# Altium PCB uECG.PcbDoc (part 1 of 2)
Units mm, origin at the board's own origin, x right, y up, seen from the top; angles counter-clockwise.
Board outline 18.82 x 18.5 mm, 4 copper layers (Top Layer, Layer 1, Layer 2, Bottom Layer), stack 1.564 mm thick; 53 components, 42 nets, 232 pads, 40 vias.
Unrouted connection lines stored in the file: 26.
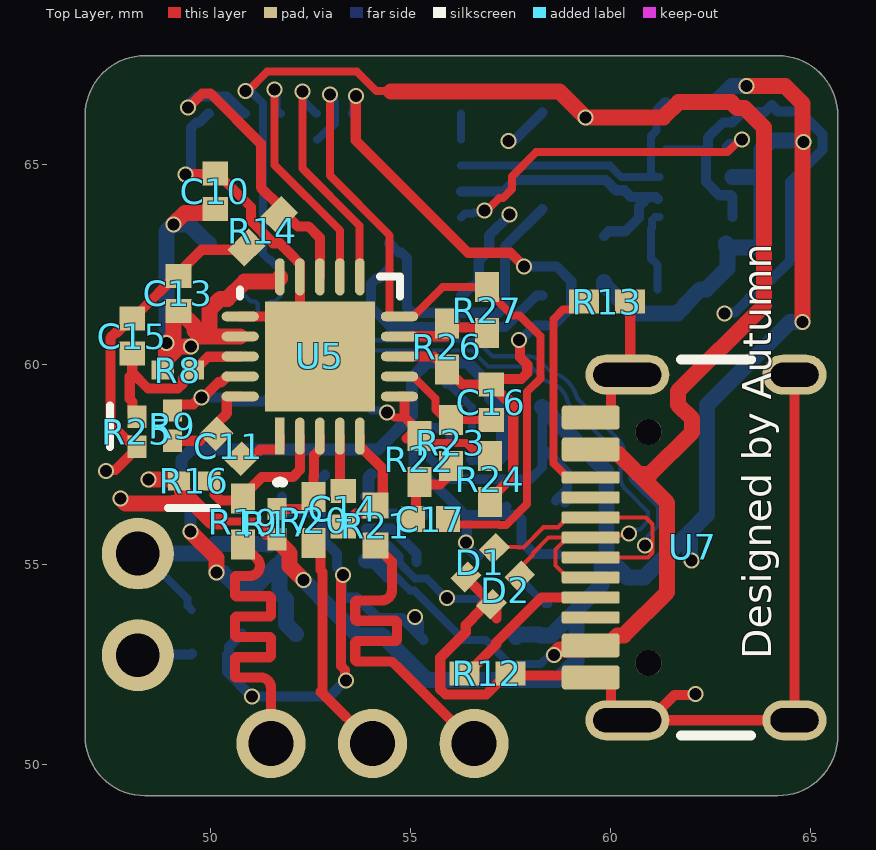
[diagram p0: Top Layer view]
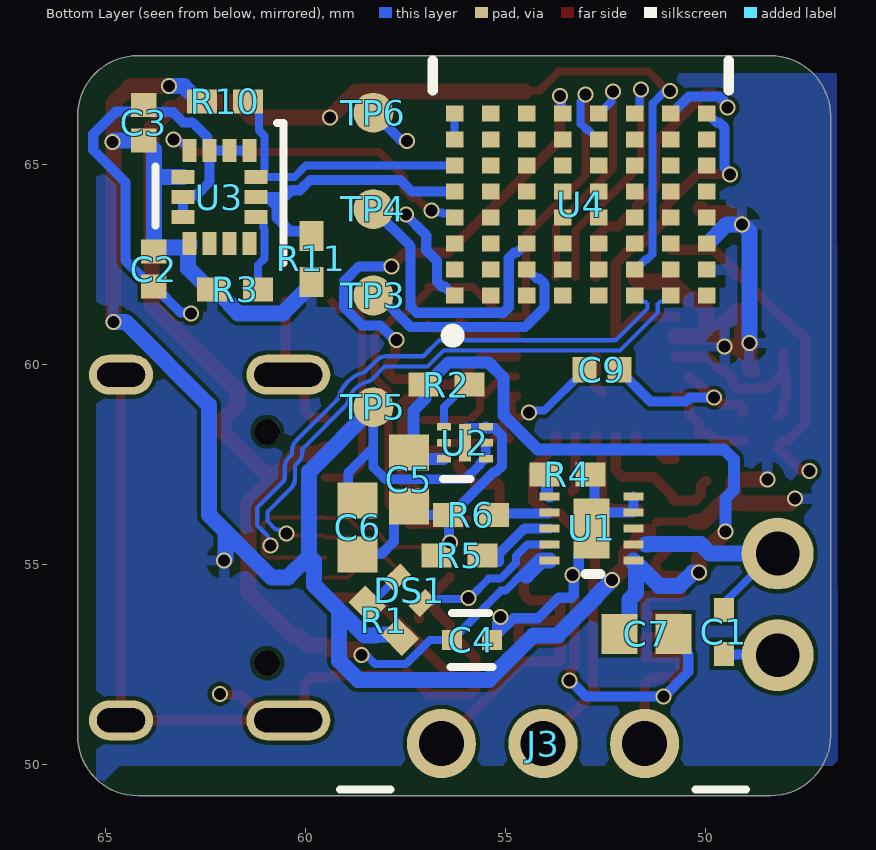
[diagram p1: Bottom Layer view, seen from below]
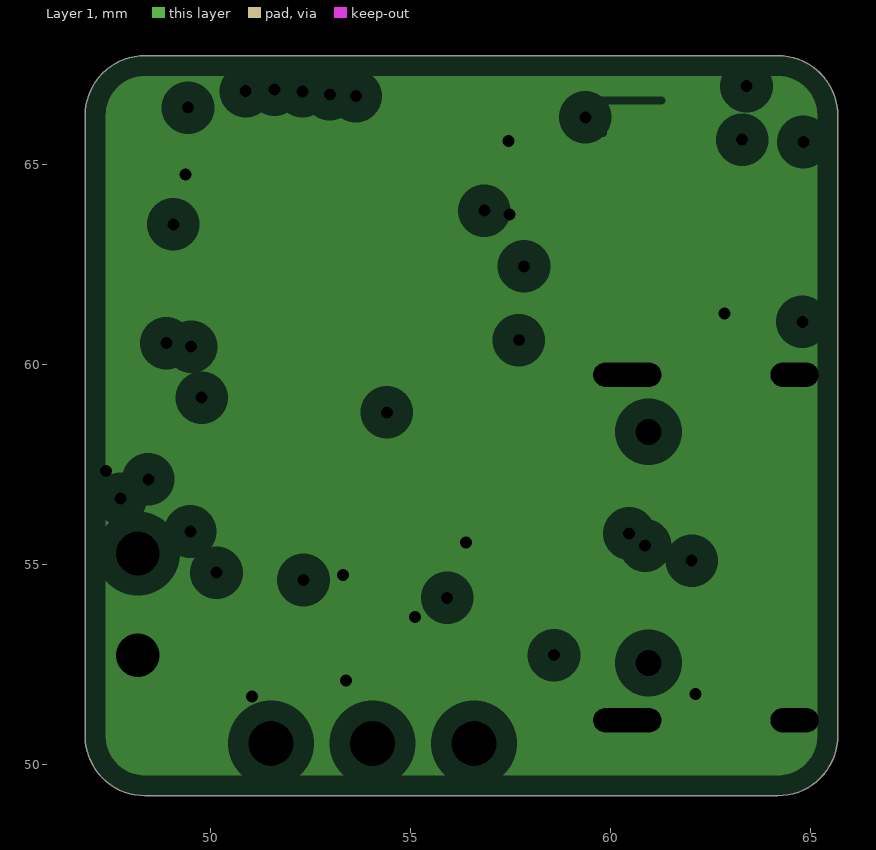
[diagram p2: Layer 1, clearances drawn from the general rule]
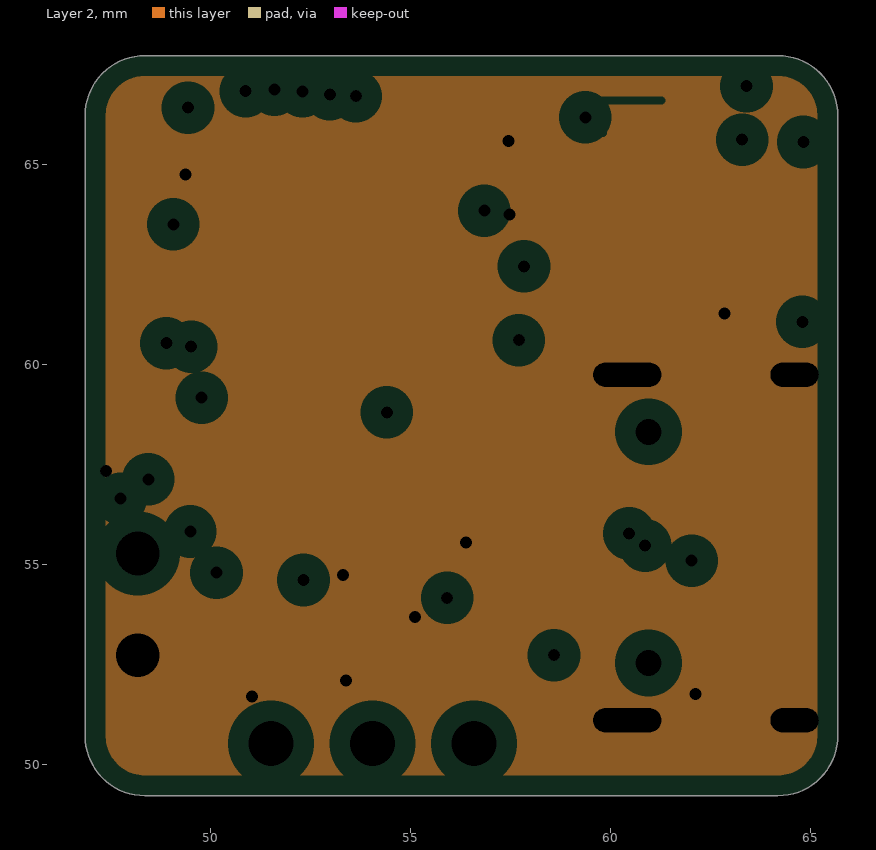
[diagram p3: Layer 2, clearances drawn from the general rule]

## Layer stack, top to bottom
Top Solder: solder mask 0.0102, Solder Resist, Dk 3.5
Top Layer: signal copper 0.035
Dielectric 2: prepreg 0.0994, PP-006, Dk 4.1
Layer 1: plane copper 0.0152, net GND
Dielectric 1: dielectric 1.265, FR-4, Dk 4.1
Layer 2: plane copper 0.0152, net GND
Dielectric 3: prepreg 0.0994, PP-006, Dk 4.1
Bottom Layer: signal copper 0.035
Bottom Solder: solder mask 0.0102, Solder Resist, Dk 3.5

## Board outline
48.363,49.217 cw(c48.363,50.717) 46.863,50.717 46.863,66.216 cw(c48.363,66.216) 48.363,67.716 64.184,67.716 cw(c64.184,66.216) 65.684,66.216 65.684,50.717 cw(c64.184,50.717) 64.184,49.217

## Design rules (kind name [scope] priority, off if disabled: settings)
Clearance [All] p1: gap=0.1 ignorepadtopadclearanceinfootprint=TRUE except(0.15: SMDPad-SMDPad; 0.2: Arc-Hole Track-Hole)
ComponentClearance ComponentClearance_1 [InComponent('B1')] p1: gap=0 collisioncheckmode=3 verticalgap=2540 showdistances=TRUE
ComponentClearance [All] p2: gap=0.1 collisioncheckmode=3 verticalgap=2540 showdistances=TRUE
DiffPairsRouting [All] p1: maxlimit=0.15 minlimit=0.15 mostfreqgap=0.15 toplayer_minwidth=0.104 toplayer_maxwidth=0.104 toplayer_prefwidth=0.104 bottomlayer_minwidth=0.104 bottomlayer_maxwidth=0.104 bottomlayer_prefwidth=0.104 impedanceprofiledriven=TRUE impedanceprofileid={66AD4E38-8EE7-434F-8265-27BB537C61B1} impedanceprofilevalue=100.000000 maxuncoupledlength=12.7
MatchedLengths [All] p1: tolerance=25.4 checknetsindiffpair=FALSE checkdiffpairvsdiffpair=TRUE checkxsignals=TRUE checkothers=TRUE
PlaneClearance [All] p1: clearance=0.508
PlaneConnect [All] p1: planeconnectstyle=Relief reliefexpansion=0.508 reliefentries=2 reliefconductorwidth=0.254 reliefairgap=0.254
PolygonConnect [All] p1: connectstyle=Relief reliefconductorwidth=0.254 reliefentries=4 polygonreliefangle="90 Angle" airgapwidth=0.254
RoutingVias [All] p1: holewidth=0.3 width=0.4 viastyle="Through Hole" minholewidth=0.3 minwidth=0.4 maxholewidth=0.3 maxwidth=0.4
SolderMaskExpansion [All] p1: expansion=0 istentingtop=FALSE
SupplyNets "Schematic Supply Nets" [InNet('GND')] p1: voltage=0.000
Width VBUS [InNet('VBUS') OR InNet('VOUT') OR InNet('BAT') or InNet('3V3')] p1: maxlimit=0.4 minlimit=0.2 preferedwidth=0.4 minimp=50.000000 maximp=50.000000 favimp=50.000000
Width [All] p2: maxlimit=0.3 minlimit=0.102 preferedwidth=0.2 minimp=50.000000 maximp=50.000000 favimp=50.000000
26 further rules are at their usual default settings.

## Classes and differential pairs
differential pair D: +D_P -D_N

## Components (designator, comment, footprint, x,y, rotation, side; value= is the part's Value field where it differs from the comment)
C1 "0402YD105MAT2A" FP-0402-L_1_0_1-W_0_5_0_1-MFG 49.53,53.315 r270 bottom
C2 "0.1 µF" "CAP 0402_1005" 63.779,62.382 r90 bottom
C3 "0.1 µF" "CAP 0402_1005" 64.033,66.04 r270 bottom
C4 "CC0402KRX5R8BB105" FP-CC0402-MFG 55.829,53.111 r180 bottom value="1 uF"
C5 "2.2 µF" "CAP 0603_1608" 57.404,57.125 r90 bottom
C6 "2.2 µF" "CAP 0603_1608" 58.685,55.927 r90 bottom
C7 "10 µF" "CAP 0603_1608" 51.46,53.264 r0 bottom
C9 "4.7 µF" "CAP 0402_1005" 52.578,59.868 r0 bottom
C10 "4.7 µF" "CAP 0402_1005" 50.114,64.33 r90 top
C11 "4.7 µF" "CAP 0402_1005" 50.456,57.953 r135 top
C13 "0.1 µF" "CAP 0402_1005" 49.2,61.773 r270 top
C14 "1000 pF" "CAP 0402_1005" 53.315,56.388 r90 top
C15 "0.1 µF" "CAP 0402_1005" 48.043,60.707 r270 top
C16 "6800 pF" "CAP 0402_1005" 57.023,59.055 r270 top
C17 "2700 pF" "CAP 0402_1005" 55.499,56.134 r180 top
D1 "ESD321DPYR" FP-DPY0002A-MFG 56.744,55.042 r225 top value=0.9pF
D2 "ESD321DPYR" FP-DPY0002A-MFG 57.379,54.356 r225 top value=0.9pF
DS1 "16-219A/T2D-AR2T1QY/3T" EVRL-0402-2_V 57.379,54.356 r225 bottom
J3 "0705530002" "MOLEX SDA-70553-3PIN" 54.051,44.298 r0 bottom
R1 "1 kOhms" "RES 0402_1005" 58.039,53.596 r45 bottom
R2 "10 kOhms" "RES 0402_1005" 56.467,59.495 r0 bottom
R3 "10K" "RES 0402_1005" 61.747,61.874 r180 bottom
R4 "10 kOhms" "RES 0402_1005" 53.441,57.241 r0 bottom
R5 "3 kOhms" "RES 0402_1005" 56.134,55.22 r180 bottom
R6 "18 kOhms" "RES 0402_1005" 55.855,56.236 r180 bottom
R8 "CRGCQ0402J10M" FP-CRGCQ0402-IPC_C 49.186,59.858 r0 top value=10MΩ
R9 "CRGCQ0402J10M" FP-CRGCQ0402-IPC_C 49.047,58.471 r270 top value=10MΩ
R10 "10 kOhms" "RES 0402_1005" 62.001,66.573 r0 bottom
R11 "10 kOhms" "RES 0402_1005" 59.842,62.636 r270 bottom
R12 "5.1K" "RES 0402_1005" 56.921,52.273 r180 top
R13 "5.1K" "RES 0402_1005" 59.919,61.57 r180 top
R14 "100 kOhms" "RES 0402_1005" 51.309,63.325 r45 top
R16 "10M" FP-CRGCQ0402-IPC_C 49.59,57.087 r0 top value=10MΩ
R17 "10M" FP-CRGCQ0402-IPC_C 51.664,56.007 r90 top value=10MΩ
R19 "330 kOhms" "RES 0402_1005" 50.815,56.066 r90 top
R20 "330 kOhms" "RES 0402_1005" 52.578,56.106 r90 top
R21 "CRCW0402360KJNED" RESC1005X40X25ML05T05 54.131,55.968 r270 top
R22 "1 MOhms" "RES 0402_1005" 55.22,57.633 r90 top
R23 "1 MOhms" "RES 0402_1005" 56.007,58.039 r90 top
R24 "100 kOhms" "RES 0402_1005" 56.99,57.13 r90 top
R25 "CRGCQ0402J10M" FP-CRGCQ0402-IPC_C 48.158,58.318 r90 top value=10MΩ
R26 "332 kOhms" "RES 0402_1005" 55.917,60.441 r270 top
R27 "1 MOhms" "RES 0402_1005" 56.914,61.354 r270 top
TP3 "TestPoint_Small" TestPoint_Pad_D1.0mm 58.293,61.722 r180 bottom
TP4 "TestPoint_Small" TestPoint_Pad_D1.0mm 58.293,63.881 r180 bottom
TP5 "TestPoint_Small" TestPoint_Pad_D1.0mm 58.293,58.928 r180 bottom
TP6 "TestPoint_Small" TestPoint_Pad_D1.0mm 58.293,66.294 r180 bottom
U1 "BQ25185DLHR" WSON-10_L2.2-W2.0-P0.40-BL-EP_TI_DLH0010A 52.443,55.74 r90 bottom
U2 "MIC5528-3.3YMT-TR" FP-TDFN1212-6LD-PL-1-MFG 56.007,58.039 r0 bottom
U3 "LSM6DSRTR" FP-LGA-14L-DM00249496-MFG 62.14,64.18 r270 bottom
U4 "HJ-840" LGA-64_L7.0-W6.2-P0.90-R8-C8-S0.65-BL 53.122,64.204 r180 bottom locked
U5 "AD8232ACPZ-WP" FP-CP-20-8-IPC_A 52.734,60.197 r90 top locked
U7 "USB_C_Receptacle_USB2.0_14P" USB_C_Receptacle_HRO_TYPE-C-31-M-12 63.551,55.423 r90 top

## Footprints (in the part's own frame and the unit in brackets; to place one, negate y for a bottom-side part, rotate by r counter-clockwise, add the part's x,y. Pads: shape width x height; smd on the part's side, far side on the other; paste and mask are expansions set on the pad)
"CAP 0402_1005" [mm] "Chip Capacitor, 2-Leads, Body 1.02x0.51mm, IPC Medium Density"
  rect 0.6x0.64 smd: 1(-0.44,0) 2(0.44,0)
  body extent -0.5,-0.26 0.5,0.26, height 0.52
"CAP 0603_1608" [mm] "Chip Capacitor, 2-Leads, Body 1.60x0.80mm, IPC Medium Density"
  rect 0.9x1 smd: 1(-0.675,0) 2(0.675,0)
  body extent -0.8,-0.41 0.8,0.41, height 0.82
EVRL-0402-2_V [mm] "SMD, 2-Leads, Body 1x0.5mm"
  rect 0.4x0.6 smd: 1(-0.45,0) 2(0.45,0)
  body extent -0.5,-0.25 0.5,0.25, height 0.25
FP-0402-L_1_0_1-W_0_5_0_1-MFG [mm]
  rect 0.6x0.5 smd paste+0 mask+0: 1(-0.55,0) 2(0.55,0)
  body extent -0.5,-0.25 0.5,0.25, height 0.56
FP-CC0402-MFG [mm]
  rect 0.5x0.5 smd paste+0 mask+0: 1(-0.5,0) 2(0.5,0)
  silkscreen extent -0.53,-0.68 0.52,0.67, body extent -0.5,-0.25 0.5,0.25, height 0.55
FP-CP-20-8-IPC_A [mm]
  rect 0.931x0.239 smd paste+0 mask+0: 1(-1.991,1)
  rrect100% 0.931x0.239 smd paste+0 mask+0: 2(-1.991,0.5) 3(-1.991,0) 4(-1.991,-0.5) 5(-1.991,-1) 11(1.991,-1) 12(1.991,-0.5) 13(1.991,0) 14(1.991,0.5) 15(1.991,1)
  rrect100% 0.239x0.931 smd paste+0 mask+0: 6(-1,-1.991) 7(-0.5,-1.991) 8(0,-1.991) 9(0.5,-1.991) 10(1,-1.991) 16(1,1.991) 17(0.5,1.991) 18(0,1.991) 19(-0.5,1.991) 20(-1,1.991)
  rect 2.75x2.75 smd paste-1000 mask+0: 21(0,0)
  silkscreen extent -3.16,-2 2,2, body extent -2.96,-2.96 2.96,2.96, height 0.25
FP-CRGCQ0402-IPC_C [mm]
  rect 0.56x0.472 smd paste+0 mask+0: 1(-0.376,0) 2(0.376,0)
  body extent -0.76,-0.38 0.76,0.38, height 0.25
FP-DPY0002A-MFG [mm]
  rect 0.6x0.5 smd paste+0 mask+0: 1(-0.5,0) 2(0.5,0)
  body extent -0.5,-0.3 0.5,0.3, height 0.45
FP-LGA-14L-DM00249496-MFG [mm]
  rect 0.575x0.35 smd paste-1000 mask+0: 1(-1.162,0.75) 2(-1.162,0.25) 3(-1.162,-0.25) 4(-1.162,-0.75) 8(1.162,-0.75) 9(1.162,-0.25) 10(1.162,0.25) 11(1.163,0.75)
  rect 0.35x0.575 smd paste-1000 mask+0: 5(-0.5,-0.913) 6(0,-0.913) 7(0.5,-0.913) 12(0.5,0.913) 13(0,0.913) 14(-0.5,0.913)
  silkscreen extent -1.85,-1.6 1.65,1.6, body extent -1.5,-1.25 1.5,1.25, height 0.86
FP-TDFN1212-6LD-PL-1-MFG [mm]
  rect 0.35x0.18 smd paste+0 mask+0: 1(-0.525,0.4) 2(-0.525,0) 3(-0.525,-0.4) 4(0.525,-0.4) 5(0.525,0) 6(0.525,0.4)
  rect 0.3x0.94 smd paste+0 mask+0: 7(0,0)
  silkscreen extent -0.15,0.9 0.54,0.9, body extent -0.6,-0.6 0.6,0.6, height 0.6
LGA-64_L7.0-W6.2-P0.90-R8-C8-S0.65-BL [mm] "LGA-64_L7.0-W6.2-P0.90-R8-C8-S0.65-BL"
  rect 0.44x0.4 smd: A1(-3.137,-2.486) A2(-3.137,-1.836) A3(-3.137,-1.186) A4(-3.137,-0.536) A5(-3.137,0.114) A6(-3.137,0.764) A7(-3.137,1.414) A8(-3.137,2.064) B1(-2.237,-2.486) B2(-2.237,-1.836) B3(-2.237,-1.186) B4(-2.237,-0.536) B5(-2.237,0.114) B6(-2.237,0.764) B7(-2.237,1.414) B8(-2.237,2.064) C1(-1.337,-2.486) C2(-1.337,-1.836) C3(-1.337,-1.186) C4(-1.337,-0.536) C5(-1.337,0.114) C6(-1.337,0.764) C7(-1.337,1.414) C8(-1.337,2.064) D1(-0.437,-2.486) D2(-0.437,-1.836) D3(-0.437,-1.186) D4(-0.437,-0.536) D5(-0.437,0.114) D6(-0.437,0.764) D7(-0.437,1.414) D8(-0.437,2.064) E1(0.463,-2.486) E2(0.463,-1.836) E3(0.463,-1.186) E4(0.463,-0.536) E5(0.463,0.114) E6(0.463,0.764) E7(0.463,1.414) E8(0.463,2.064) F1(1.363,-2.486) F2(1.363,-1.836) F3(1.363,-1.186) F4(1.363,-0.536) F5(1.363,0.114) F6(1.363,0.764) F7(1.363,1.414) F8(1.363,2.064) G1(2.263,-2.486) G2(2.263,-1.836) G3(2.263,-1.186) G4(2.263,-0.536) G5(2.263,0.114) G6(2.263,0.764) G7(2.263,1.414) G8(2.263,2.064) H1(3.163,-2.486) H2(3.163,-1.836) H3(3.163,-1.186) H4(3.163,-0.536) H5(3.163,0.114) H6(3.163,0.764) H7(3.163,1.414) H8(3.163,2.064)
  silkscreen extent -3.69,-3.64 3.71,3.39, body extent -3.49,-2.29 3.51,3.91, height 0.92
"MOLEX SDA-70553-3PIN" [mm] "SL Right Angle Header W/LAtch & Trip-Pegs 2.54mm Centres"
  round 1.73 hole 1.13: 1(-2.54,-6.223) 2(0,-6.223) 3(2.54,-6.223)
  silkscreen extent -5.08,-5.08 5.08,-5.08
"RES 0402_1005" [mm] "Chip Resistor, 2-Leads, Body 1.0x0.5mm, IPC Medium Density"
  rect 0.75x0.6 smd: 1(-0.575,0) 2(0.575,0)
  body extent -0.5,-0.25 0.5,0.25, height 0.35
RESC1005X40X25ML05T05 [mm] "Chip Resistor, 2-Leads, Body 1.00x0.50mm, IPC Low Density"
  rect 0.65x0.65 smd: 1(-0.5,0) 2(0.5,0)
  body extent -0.53,-0.27 0.53,0.28, height 0.4
TestPoint_Pad_D1.0mm [mm]
  round 1 smd: 1(0,0)
USB_C_Receptacle_HRO_TYPE-C-31-M-12 [mm]
  rrect25% 0.6x1.45 smd: A1(-3.25,4.045) A4(-2.45,4.045) A9(2.45,4.045) A12(3.25,4.045) B1(3.25,4.045) B4(2.45,4.045) B9(-2.45,4.045) B12(-3.25,4.045)
  rrect25% 0.3x1.45 smd: A5(-1.25,4.045) A6(-0.25,4.045) A7(0.25,4.045) A8(1.25,4.045) B5(1.75,4.045) B6(0.75,4.045) B7(-0.75,4.045) B8(-1.75,4.045)
  rrect100% 1x1.6 hole 1.2 slot 0.6 at 0 deg: SH(-4.32,-1.05) SH(4.32,-1.05)
  rrect100% 1x2.1 hole 1.7 slot 0.6 at 0 deg: SH(-4.32,3.13) SH(4.32,3.13)
  round 0.65 hole 0.65: Un1(-2.89,2.6) Un2(2.89,2.6)
  silkscreen extent -4.7,0.04 4.7,1.79
WSON-10_L2.2-W2.0-P0.40-BL-EP_TI_DLH0010A [mm] "WSON-10_L2.2-W2.0-P0.40-BL-EP_TI_DLH0010A"
  rect 0.2x0.5 smd: 1(-0.642,-0.657) 2(-0.242,-0.657) 3(0.158,-0.657) 4(0.558,-0.657) 5(0.958,-0.657) 6(0.958,1.443) 7(0.558,1.443) 8(0.158,1.443) 9(-0.242,1.443) 10(-0.642,1.443)
  rect 1.5x0.9 smd: 11(0.158,0.393)
  silkscreen extent -0.99,0.17 -0.99,0.55, body extent -0.84,-0.72 1.17,1.5, height 0.8

## Part data
C1: library part CMP-04427-002736-1, "General Purpose Ceramic Capacitor, 0402, 1uF, 20%, X5R, 15%, 16V", Capacitance=1uF, Case/Package=0402, Dielectric=X5R, Max Operating Temperature=85°C, Min Operating Temperature=-55°C, Package Quantity=10000, Tolerance=20%, Voltage Rating (DC)=16V, packaging="Tape and Reel", RoHS Compliant=Yes
C2 C3 C13 C15: library part CL05B104KP5VPNC, "CAP CER 100NF 10V X7R 0402", Device Package="0402 (1005 Metric)", manufacturer="Samsung Electro-Mechanics", Operating Temperature="-55°C ~ 125°C", Ratings=AEC-Q200, Supplier Part Number 1=1276-CL05B104KP5VPNCCT-ND, Temperature Coefficient=X7R, Tolerance=±10%, Voltage - Rated=10V, Applications=Automotive, Capacitance="0.1 µF", componentlink1description=Datasheet, componentlink1url=https://mm.digikey.com/Volume0/opasdata/d220001/medias/docus/5458/CL05B104KP5VPNC_Spec.pdf, componentlink2description="DigiKey Link", componentlink2url=https://www.digikey.com/en/products/detail/samsung-electro-mechanics/CL05B104KP5VPNC/20498482, Features="General Purpose", lastupdated="06-04-2026 19:07:45", Lifecycle Status=Active, Minimum Order=1, Mounting Type="Surface Mount, MLCC, Epoxy", Package / Case="0402 (1005 Metric)", packaging=TapeAndReel, Part Number=CL05B104KP5VPNC, partid=56690, price=0.01, series=CL, Size / Dimension="0.039\" L x 0.020\" W (1.00mm x 0.50mm)", Supplier 1=DigiKey, Thickness (Max)="0.022\" (0.55mm)"
C4: library part CMP-03422-000114-1, "CAP CER 1UF 25V X5R 0402", Capacitance="1 uF", manufacturer=YAGEO, Package=CC0402, Temperature="-55°C to +125°C", Temperature Characteristic=X5R, Temperature Coefficient=30ppm/°C, Temperature Range High=+125°C, Temperature Range Low=-55°C, Tolerance=0.1, Voltage Rating="25 V", Automotive=No, Automotive Grade=NA, Category=Cap, componentlink2description=Datasheet, componentlink2url=http://www.yageo.com/documents/recent/UPY-GP_NP0_16V-to-50V_16.pdf, Device Class L1="Passive Components", Device Class L2=Capacitors, Device Class L3="Ceramic Capacitors", Digikey Description="CAP CER 1UF 25V X5R 0402", Footprint Url=http://www.yageo.com/exep/pages/download/literatures/UPY-C_GEN_24.pdf, Height=0.55mm, Ipc Land Pattern Name=CAPC10050X50, Lead Free=Yes, Manufacturer Part Number=CC0402KRX5R8BB105, Material=Ceramic, Mouser Description="Multilayer Ceramic Capacitors MLCC - SMD/SMT 1M pF 10% 25 Volts", Octopart=https://octopart.com/cc0402krx5r8bb105-yageo-57080749, RoHS=TRUE
C5 C6: library part GRM188R61E225KA12D, "CAP CER 2.2UF 16V X5R 0402", Device Package="0402 (1005 Metric)", manufacturer="Samsung Electro-Mechanics", Operating Temperature="-55°C ~ 85°C", Part Number=CL05A225KO5NQNC, Supplier Part Number 1=1276-1461-1-ND, Temperature Coefficient=X5R, Tolerance=±10%, Voltage - Rated=16V, Applications="General Purpose", Capacitance="2.2 µF", componentlink1description=Datasheet, componentlink1url=http://www.samsungsem.com/kr/support/product-search/mlcc/CL05A225KO5NQNC.jsp, componentlink2description="DigiKey Link", componentlink2url=https://www.digikey.com/en/products/detail/samsung-electro-mechanics/CL05A225KO5NQNC/3887119, id=34, lastupdated=2023-01-03T20:04:20.330, Lifecycle Status=Active, Minimum Order=1, Mounting Type="Surface Mount, MLCC", Package / Case="0402 (1005 Metric)", packaging=TapeAndReel, Part Status=Active, partid=1761, price=0.03, series=CL, Size / Dimension="0.039\" L x 0.020\" W (1.00mm x 0.50mm)", Supplier 1=DigiKey, Thickness (Max)="0.022\" (0.55mm)"
C7: library part TMK107BBJ106MA-T, "CAP CER 10UF 25V X5R 0603", Device Package="0603 (1608 Metric)", manufacturer="Taiyo Yuden", Operating Temperature="-55°C ~ 85°C", Supplier Part Number 1=587-6023-1-ND, Temperature Coefficient=X5R, Tolerance=±20%, Voltage - Rated=25V, Applications="SMPS Filtering", Capacitance="10 µF", componentlink1description=Datasheet, componentlink1url="https://ds.yuden.co.jp/TYCOMPAS/ut/detail?pn=TMK107BBJ106MA-T &u=M", componentlink2description="DigiKey Link", componentlink2url=https://www.digikey.com/en/products/detail/taiyo-yuden/TMK107BBJ106MA-T/7403921, id=1600, lastupdated=2023-01-03T20:07:28.623, Lifecycle Status=Active, Minimum Order=1, Mounting Type="Surface Mount, MLCC", Package / Case="0603 (1608 Metric)", packaging=TapeAndReel, Part Number=TMK107BBJ106MA-T, Part Status=Active, partid=8967, price=0.07, series=M, Size / Dimension="0.063\" L x 0.031\" W (1.60mm x 0.80mm)", Supplier 1=DigiKey, Thickness (Max)="0.039\" (1.00mm)"
C9 C10 C11: library part CL05A475MO5NUNC, "CAP CER 4.7UF 16V X5R 0402", Device Package="0402 (1005 Metric)", manufacturer="Samsung Electro-Mechanics", Operating Temperature="-55°C ~ 85°C", Supplier Part Number 1=1276-6836-1-ND, Temperature Coefficient=X5R, Tolerance=±20%, Voltage - Rated=16V, Applications="General Purpose", Capacitance="4.7 µF", componentlink1description=Datasheet, componentlink1url=http://www.samsungsem.com/kr/support/product-search/mlcc/__icsFiles/afieldfile/2019/05/29/Data%20sheet_CL05A475MO5NUNC.pdf, componentlink2description="DigiKey Link", componentlink2url=https://www.digikey.com/en/products/detail/samsung-electro-mechanics/CL05A475MO5NUNC/5961320, lastupdated="06-04-2026 19:11:12", Lifecycle Status=Active, Minimum Order=1, Mounting Type="Surface Mount, MLCC", Package / Case="0402 (1005 Metric)", packaging=TapeAndReel, Part Number=CL05A475MO5NUNC, Part Status=Active, partid=1760, price=0.07, series=CL, Size / Dimension="0.039\" L x 0.020\" W (1.00mm x 0.50mm)", Supplier 1=DigiKey, Thickness (Max)="0.028\" (0.70mm)"
C14: library part C0402C102K1GECAUTO, "CAP CER 0402 1NF 100V C0G 10%", Device Package="0402 (1005 Metric)", manufacturer=KEMET, Operating Temperature="-55°C ~ 125°C", Ratings=AEC-Q200, Supplier Part Number 1=399-17168-1-ND, Temperature Coefficient="C0G, NP0", Tolerance=±10%, Voltage - Rated=100V, Applications="Automotive, ESD Protection", Capacitance="1000 pF", componentlink1description=Datasheet, componentlink1url=https://api.kemet.com/component-edge/download/datasheet/C0402C102K1GECAUTO.pdf, componentlink2description="DigiKey Link", componentlink2url=https://www.digikey.com/en/products/detail/kemet/C0402C102K1GECAUTO/8563696, Features="Low ESL, Low ESR", lastupdated="06-04-2026 19:10:35", Lifecycle Status=Active, Minimum Order=1, Mounting Type="Surface Mount, MLCC", Package / Case="0402 (1005 Metric)", packaging=TapeAndReel, Part Number=C0402C102K1GECAUTO, Part Status=Active, partid=10371, price=0.02, series="ESD SMD Auto C0G", Size / Dimension="0.039\" L x 0.020\" W (1.00mm x 0.50mm)", Supplier 1=DigiKey, Thickness (Max)="0.022\" (0.55mm)"
C16: library part C0402C682K5RECAUTO, "CAP CER 0402 6.8NF 50V X7R 10%", Device Package="0402 (1005 Metric)", manufacturer=KEMET, Operating Temperature="-55°C ~ 125°C", Ratings=AEC-Q200, Supplier Part Number 1=399-C0402C682K5RECAUTOCT-ND, Temperature Coefficient=X7R, Tolerance=±10%, Voltage - Rated=50V, Applications="Automotive, ESD Protection", Capacitance="6800 pF", componentlink1description=Datasheet, componentlink1url=https://api.kemet.com/component-edge/download/datasheet/C0402C682K5RECAUTO.pdf, componentlink2description="DigiKey Link", componentlink2url=https://www.digikey.com/en/products/detail/kemet/C0402C682K5RECAUTO/8646476, lastupdated="06-04-2026 19:10:09", Lifecycle Status=Active, Minimum Order=1, Mounting Type="Surface Mount, MLCC", Package / Case="0402 (1005 Metric)", packaging=TapeAndReel, Part Number=C0402C682K5RECAUTO, Part Status=Active, partid=33549, price=0.01, series="ESD SMD Auto X7R", Size / Dimension="0.039\" L x 0.020\" W (1.00mm x 0.50mm)", Supplier 1=DigiKey, Thickness (Max)="0.022\" (0.55mm)"
C17: library part C0402C272K4RAC7867, "CAP CER 2700PF 16V X7R 0402", Device Package="0402 (1005 Metric)", manufacturer=KEMET, Operating Temperature="-55°C ~ 125°C", Supplier Part Number 1=399-17379-1-ND, Temperature Coefficient=X7R, Tolerance=±10%, Voltage - Rated=16V, Applications="Bypass, Decoupling", Capacitance="2700 pF", componentlink1description=Datasheet, componentlink1url=https://api.kemet.com/component-edge/download/datasheet/C0402C272K4RACTU.pdf, componentlink2description="DigiKey Link", componentlink2url=https://www.digikey.com/en/products/detail/kemet/C0402C272K4RAC7867/2196549, lastupdated="06-04-2026 19:11:02", Lifecycle Status=Active, Minimum Order=1, Mounting Type="Surface Mount, MLCC", Package / Case="0402 (1005 Metric)", packaging=TapeAndReel, Part Number=C0402C272K4RAC7867, Part Status=Active, partid=3725, price=0.06, series="SMD Comm X7R", Size / Dimension="0.039\" L x 0.020\" W (1.00mm x 0.50mm)", Supplier 1=DigiKey, Thickness (Max)="0.022\" (0.55mm)"
D1 D2: library part CMP-04989-000001-1, "HDMI2.0 ESD PROTECTION", Ambient Temperature Range High=+125°C, Ambient Temperature Range Low=-40°C, Breakdown Voltage=4.5V, Capacitance=0.9pF, Clamping Voltage=6.8V, manufacturer="Texas Instruments", Package=DPY0002A, Peak Pulse Current=6A, Peak Pulse Power=40W, Reverse Standoff Voltage=3.6V, Temperature="-40°C to +125°C", Automotive=No, Category=Diode, componentlink2description=Datasheet, componentlink2url=http://www.ti.com/lit/ds/symlink/esd321.pdf, Device Class L1="Circuit Protection", Device Class L2="TVS Diodes", Device Class L3=unset, Digikey Description="HDMI2.0 ESD PROTECTION", Direction=Unidirectional, Height=0.45mm, Lead Free=Yes, Manufacturer Part Number=ESD321DPYR, Number of Channels=1, Octopart=https://octopart.com/esd321dpyr-texas+instruments-94354200, RoHS=TRUE, Standoff Height=0mm, Temperature Range High=+125°C, Temperature Range Low=-40°C
DS1: library part CMP-2100-03575-1, "Chip LED, White, 5 V, 10 mA, 30 mW, -40 to 85 degC, 2-Pin SMD (0402), RoHS, Tape and Reel", Case/Package=0402, Forward Current=5mA, Forward Voltage=2.6V, Illumination Colour=White, Lens Colour=Yellow, manufacturer="Everlight Electronics", Max Operating Temperature=85degC, Min Operating Temperature=-40degC, Package Description="2-Pin Surface Mount Device, Body 1 x 0.5 mm", Package Quantity=3000, Power Rating=30mW, Datasheet URL=http://www.everlight.com/file/ProductFile/16-219A-T2D-AR2T1QY-3T.pdf, Datasheet Version="Rev. 5, 04/2013", Luminous Intensity=360mcd, Manufacturer URL=http://www.everlight.com/, Mount=Standard, Package Reference=0402, packaging=TapeandReel, RoHSCompliant=true, Viewing Angle=130degrees
J3: "CONN HEADER R/A 3POS 2.54MM", Insulation Color=Black, manufacturer=Molex, Material Flammability Rating="UL94 V-0", Operating Temperature="-40°C ~ 105°C", Supplier Part Number 1=WM4901-ND, Voltage Rating=250V, componentlink1description=Datasheet, componentlink1url=https://www.molex.com/pdm_docs/sd/705530002_sd.pdf, componentlink2description="DigiKey Link", componentlink2url=http://digikey.com/product-detail/en/molex/0705530002/WM4901-ND/114955, Connector Type=Header, Contact Finish - Mating=Gold, Contact Finish - Post=Tin, Contact Finish Thickness - Mating="15.0µin (0.38µm)", Contact Length - Mating="0.240\" (6.10mm)", Contact Length - Post="0.130\" (3.30mm)", Contact Material="Phosphor Bronze", Contact Shape=Square, Contact Type="Male Pin", Fastening Type="Latch Holder", id=86, Insulation Height="0.215\" (5.45mm)", Insulation Material="Polyester, Glass Filled", lastupdated=2020-01-12T23:55:55.763, Lifecycle Status=Active, Minimum Order=1, Mounting Type="Through Hole, Right Angle", Number of Positions=3, Number of Positions Loaded=All, Number of Rows=1, packaging=Tube, Part Number=0705530002, Part Status=Active, partid=86, Pitch - Mating="0.100\" (2.54mm)", price=1.02, series="SL 70553", Shrouding="Shrouded - 4 Wall", Style="Board to Cable/Wire", Supplier 1=DigiKey, Termination=Solder
R1: library part CPF0402B1K0E, "RES SMD 1K OHM 0.1% 1/16W 0402", Device Package="0402 (1005 Metric)", manufacturer="TE Connectivity Passive Product", Operating Temperature="-55°C ~ 155°C", Power (Watts)="0.063W, 1/16W", Supplier Device Package=0402, Supplier Part Number 1=A119928CT-ND, Temperature Coefficient=±25ppm/°C, Tolerance=±0.1%, componentlink1description=Datasheet, componentlink1url=https://www.te.com/commerce/DocumentDelivery/DDEController?Action=srchrtrv&DocNm=1773200&DocType=DS&DocLang=English, componentlink2description="DigiKey Link", componentlink2url=https://www.digikey.com/en/products/detail/te-connectivity-passive-product/CPF0402B1K0E/4966468, Composition="Thin Film", Height - Seated (Max)="0.014\" (0.35mm)", id=25, lastupdated=2023-01-02T20:21:51.393, Lifecycle Status=Active, Minimum Order=1, Number of Terminations=2, Package / Case="0402 (1005 Metric)", packaging=TapeAndReel, Part Number=CPF0402B1K0E, Part Status=Active, partid=2470, price=0.10, Resistance="1 kOhms", series="CPF, Neohm", Size / Dimension="0.039\" L x 0.020\" W (1.00mm x 0.50mm)", Supplier 1=DigiKey
R2 R10 R11: library part RT0402FRE0710KL, "RES 10K OHM 0.1% 1/10W 0402", Device Package="0402 (1005 Metric)", manufacturer="TE Connectivity Passive Product", Operating Temperature="-55°C ~ 155°C", Part Number=RP73PF1E10KBTD, Power (Watts)="0.1W, 1/10W", Supplier Device Package=0402, Supplier Part Number 1=A127415CT-ND, Temperature Coefficient=±25ppm/°C, Tolerance=±0.1%, componentlink1description=Datasheet, componentlink1url=https://www.te.com/commerce/DocumentDelivery/DDEController?Action=srchrtrv&DocNm=1773272&DocType=DS&DocLang=English, componentlink2description="DigiKey Link", componentlink2url=https://www.digikey.com/en/products/detail/te-connectivity-passive-product/RP73PF1E10KBTD/8260957, Composition="Thin Film", Height - Seated (Max)="0.014\" (0.35mm)", id=8, lastupdated=2023-01-02T20:21:51.543, Lifecycle Status=Active, Minimum Order=1, Number of Terminations=2, Package / Case="0402 (1005 Metric)", packaging=TapeAndReel, Part Status=Active, partid=2434, price=0.08, Resistance="10 kOhms", series="RP73, Holsworthy", Size / Dimension="0.039\" L x 0.020\" W (1.00mm x 0.50mm)", Supplier 1=DigiKey
R3: library part AC0402JR-0710KL, "RES SMD 10K OHM 5% 1/16W 0402", Device Package="0402 (1005 Metric)", manufacturer=Yageo, Operating Temperature="-55°C ~ 155°C", Power (Watts)="0.063W, 1/16W", Ratings=AEC-Q200, Resistance="10 kOhms", Supplier Device Package=0402, Supplier Part Number 1=YAG3517CT-ND, Temperature Coefficient=±100ppm/°C, Tolerance=±5%, componentlink1description=Datasheet, componentlink1url=https://www.yageo.com/upload/media/product/productsearch/datasheet/rchip/PYu-AC_51_RoHS_L_7.pdf, componentlink2description="DigiKey Link", componentlink2url=https://www.digikey.com/en/products/detail/yageo/AC0402JR-0710KL/5895571, Composition="Thick Film", Features="Automotive AEC-Q200, Moisture Resistant", Height - Seated (Max)="0.015\" (0.37mm)", lastupdated="06-04-2026 19:41:17", Lifecycle Status=Active, Minimum Order=1, Number of Terminations=2, Package / Case="0402 (1005 Metric)", packaging=CutTape, Part Number=AC0402JR-0710KL, Part Status=Active, partid=3376, price=0.01, series=AC, Size / Dimension="0.039\" L x 0.020\" W (1.00mm x 0.50mm)", Supplier 1=DigiKey
R4: library part AC0402JR-0710KL, "RES 10K OHM 0.1% 1/10W 0402", Device Package="0402 (1005 Metric)", manufacturer="TE Connectivity Passive Product", Operating Temperature="-55°C ~ 155°C", Part Number=RP73PF1E10KBTD, Power (Watts)="0.1W, 1/10W", Supplier Device Package=0402, Supplier Part Number 1=A127415CT-ND, Temperature Coefficient=±25ppm/°C, Tolerance=±0.1%, componentlink1description=Datasheet, componentlink1url=https://www.te.com/commerce/DocumentDelivery/DDEController?Action=srchrtrv&DocNm=1773272&DocType=DS&DocLang=English, componentlink2description="DigiKey Link", componentlink2url=https://www.digikey.com/en/products/detail/te-connectivity-passive-product/RP73PF1E10KBTD/8260957, Composition="Thin Film", Height - Seated (Max)="0.014\" (0.35mm)", id=8, lastupdated=2023-01-02T20:21:51.543, Lifecycle Status=Active, Minimum Order=1, Number of Terminations=2, Package / Case="0402 (1005 Metric)", packaging=TapeAndReel, Part Status=Active, partid=2434, price=0.08, Resistance="10 kOhms", series="RP73, Holsworthy", Size / Dimension="0.039\" L x 0.020\" W (1.00mm x 0.50mm)", Supplier 1=DigiKey
R5: library part RC0402FR-073KL, "RES 3K OHM 1% 1/16W 0402", Device Package="0402 (1005 Metric)", manufacturer=Yageo, Operating Temperature="-55°C ~ 155°C", Power (Watts)="0.063W, 1/16W", Supplier Device Package=0402, Supplier Part Number 1=311-3KLRCT-ND, Temperature Coefficient=±100ppm/°C, Tolerance=±1%, componentlink1description=Datasheet, componentlink1url=https://www.yageo.com/upload/media/product/productsearch/datasheet/rchip/PYu-RC_Group_51_RoHS_L_10.pdf, componentlink2description="DigiKey Link", componentlink2url=https://www.digikey.com/en/products/detail/yageo/RC0402FR-073KL/2827586, Composition="Thick Film", Features="Moisture Resistant", Height - Seated (Max)="0.016\" (0.40mm)", id=33, lastupdated=2023-01-02T20:21:51.323, Lifecycle Status=Active, Minimum Order=1, Number of Terminations=2, Package / Case="0402 (1005 Metric)", packaging=CutTape, Part Number=RC0402FR-073KL, Part Status=Active, partid=2489, price=0.01, Resistance="3 kOhms", series=RC_L, Size / Dimension="0.039\" L x 0.020\" W (1.00mm x 0.50mm)", Supplier 1=DigiKey
R6: library part RC0402FR-0718KL, "RES 18K OHM 1% 1/16W 0402", Device Package="0402 (1005 Metric)", manufacturer=Yageo, Operating Temperature="-55°C ~ 155°C", Power (Watts)="0.063W, 1/16W", Supplier Device Package=0402, Supplier Part Number 1=311-18.0KLRCT-ND, Temperature Coefficient=±100ppm/°C, Tolerance=±1%, componentlink1description=Datasheet, componentlink1url=https://www.yageo.com/upload/media/product/productsearch/datasheet/rchip/PYu-RC_Group_51_RoHS_L_10.pdf, componentlink2description="DigiKey Link", componentlink2url=https://www.digikey.com/en/products/detail/yageo/RC0402FR-0718KL/726548, Composition="Thick Film", Features="Moisture Resistant", Height - Seated (Max)="0.016\" (0.40mm)", id=68, lastupdated=2023-01-02T20:21:51.053, Lifecycle Status=Active, Minimum Order=1, Number of Terminations=2, Package / Case="0402 (1005 Metric)", packaging=CutTape, Part Number=RC0402FR-0718KL, Part Status=Active, partid=2565, price=0.01, Resistance="18 kOhms", series=RC_L, Size / Dimension="0.039\" L x 0.020\" W (1.00mm x 0.50mm)", Supplier 1=DigiKey
R8 R9 R25: library part CMP-03211-005642-1, "CRGCQ 0402 10M 5%", Ambient Temperature Range High=+70°C, manufacturer="TE Connectivity", Package=CRGCQ0402, Power Rating=0.0625W, Resistance=10MΩ, Temperature="-55°C to +155°C", Temperature Coefficient=±100ppm/°C, Temperature Range High=+155°C, Temperature Range Low=-55°C, Tolerance=0.05, Voltage Rating=50V, Automotive=Yes, Category=Res, componentlink2description=Datasheet, componentlink2url=https://www.te.com/commerce/DocumentDelivery/DDEController?Action=showdoc&DocId=Data+Sheet%7F1773204-3%7F1%7Fpdf%7FEnglish%7FENG_DS_1773204-3_1.pdf%7F4-2176347-1607, Composition="Thick Film", Device Class L1="Passive Components", Device Class L2=Resistors, Device Class L3="Chip SMD Resistors", Digikey Description="CRGCQ 0402 10M 5%", Height=0.4mm, Ipc Land Pattern Name=RESC10050X35, Lead Free=Yes, Manufacturer Part Number=CRGCQ0402J10M, Octopart=https://octopart.com/crgcq0402j10m-te+connectivity-91017994, RoHS=TRUE, series=CRGCQ
R12 R13: library part AC0402JR-075K1L, "RES SMD 5.1K OHM 5% 1/16W 0402", Device Package="0402 (1005 Metric)", manufacturer=Yageo, Operating Temperature="-55°C ~ 155°C", Power (Watts)="0.063W, 1/16W", Ratings=AEC-Q200, Resistance="5.1 kOhms", Supplier Device Package=0402, Supplier Part Number 1=YAG3554CT-ND, Temperature Coefficient=±100ppm/°C, Tolerance=±5%, componentlink1description=Datasheet, componentlink1url=https://www.yageo.com/upload/media/product/productsearch/datasheet/rchip/PYu-AC_51_RoHS_L_7.pdf, componentlink2description="DigiKey Link", componentlink2url=https://www.digikey.com/en/products/detail/yageo/AC0402JR-075K1L/5895695, Composition="Thick Film", Features="Automotive AEC-Q200, Moisture Resistant", Height - Seated (Max)="0.015\" (0.37mm)", lastupdated="06-04-2026 19:41:15", Lifecycle Status=Active, Minimum Order=1, Number of Terminations=2, Package / Case="0402 (1005 Metric)", packaging=CutTape, Part Number=AC0402JR-075K1L, Part Status=Active, partid=4690, price=0.01, series=AC, Size / Dimension="0.039\" L x 0.020\" W (1.00mm x 0.50mm)", Supplier 1=DigiKey
R14: library part RP73PF1E100KBTD, "RES 100K OHM 0.1% 1/10W 0402", Device Package="0402 (1005 Metric)", manufacturer="TE Connectivity Passive Product", Operating Temperature="-55°C ~ 155°C", Power (Watts)="0.1W, 1/10W", Supplier Device Package=0402, Supplier Part Number 1=A127511CT-ND, Temperature Coefficient=±25ppm/°C, Tolerance=±0.1%, componentlink1description=Datasheet, componentlink1url=https://www.te.com/commerce/DocumentDelivery/DDEController?Action=srchrtrv&DocNm=1773272&DocType=DS&DocLang=English, componentlink2description="DigiKey Link", componentlink2url=https://www.digikey.com/en/products/detail/te-connectivity-passive-product/RP73PF1E100KBTD/8261053, Composition="Thin Film", Height - Seated (Max)="0.014\" (0.35mm)", id=9, lastupdated=2023-01-02T20:21:51.537, Lifecycle Status=Active, Minimum Order=1, Number of Terminations=2, Package / Case="0402 (1005 Metric)", packaging=TapeAndReel, Part Number=RP73PF1E100KBTD, Part Status=Active, partid=2436, price=0.08, Resistance="100 kOhms", series="RP73, Holsworthy", Size / Dimension="0.039\" L x 0.020\" W (1.00mm x 0.50mm)", Supplier 1=DigiKey
R16 R17: library part CMP-03211-005642-1, "CRGCQ 0402 10M 5%", Ambient Temperature Range High=+70°C, manufacturer="TE Connectivity", Manufacturer Part Number=CRGCQ0402J10M, Package=CRGCQ0402, Power Rating=0.0625W, Resistance=10MΩ, Temperature="-55°C to +155°C", Temperature Coefficient=±100ppm/°C, Temperature Range High=+155°C, Temperature Range Low=-55°C, Tolerance=0.05, Voltage Rating=50V, Automotive=Yes, Category=Res, componentlink2description=Datasheet, componentlink2url=https://www.te.com/commerce/DocumentDelivery/DDEController?Action=showdoc&DocId=Data+Sheet%7F1773204-3%7F1%7Fpdf%7FEnglish%7FENG_DS_1773204-3_1.pdf%7F4-2176347-1607, Composition="Thick Film", Device Class L1="Passive Components", Device Class L2=Resistors, Device Class L3="Chip SMD Resistors", Digikey Description="CRGCQ 0402 10M 5%", Height=0.4mm, Ipc Land Pattern Name=RESC10050X35, Lead Free=Yes, Octopart=https://octopart.com/crgcq0402j10m-te+connectivity-91017994, RoHS=TRUE, series=CRGCQ
R19 R20: library part RC0402FR-07330KL, "RES 330K OHM 1% 1/16W 0402", Device Package="0402 (1005 Metric)", manufacturer=Yageo, Operating Temperature="-55°C ~ 155°C", Power (Watts)="0.063W, 1/16W", Supplier Device Package=0402, Supplier Part Number 1=311-330KLRCT-ND, Temperature Coefficient=±100ppm/°C, Tolerance=±1%, componentlink1description=Datasheet, componentlink1url=https://www.yageo.com/upload/media/product/productsearch/datasheet/rchip/PYu-RC_Group_51_RoHS_L_10.pdf, componentlink2description="DigiKey Link", componentlink2url=https://www.digikey.com/en/products/detail/yageo/RC0402FR-07330KL/2827574, Composition="Thick Film", Features="Moisture Resistant", Height - Seated (Max)="0.016\" (0.40mm)", id=164, lastupdated=2023-01-02T20:21:50.320, Lifecycle Status=Active, Minimum Order=1, Number of Terminations=2, Package / Case="0402 (1005 Metric)", packaging=CutTape, Part Number=RC0402FR-07330KL, Part Status=Active, partid=2765, price=0.01, Resistance="330 kOhms", series=RC_L, Size / Dimension="0.039\" L x 0.020\" W (1.00mm x 0.50mm)", Supplier 1=DigiKey
R21: library part CMP-2002-08545-1, manufacturer="Vishay Dale", Part Number=CRCW0402360KJNED
R22 R23 R27: library part AC0402JR-071ML, "RES SMD 1M OHM 5% 1/16W 0402", Device Package="0402 (1005 Metric)", manufacturer=Yageo, Operating Temperature="-55°C ~ 155°C", Power (Watts)="0.063W, 1/16W", Ratings=AEC-Q200, Supplier Device Package=0402, Supplier Part Number 1=YAG3526CT-ND, Temperature Coefficient=±100ppm/°C, Tolerance=±5%, componentlink1description=Datasheet, componentlink1url=https://www.yageo.com/upload/media/product/productsearch/datasheet/rchip/PYu-AC_51_RoHS_L_7.pdf, componentlink2description="DigiKey Link", componentlink2url=https://www.digikey.com/en/products/detail/yageo/AC0402JR-071ML/5895610, Composition="Thick Film", Features="Automotive AEC-Q200, Moisture Resistant", Height - Seated (Max)="0.015\" (0.37mm)", id=438, lastupdated=2023-01-02T20:21:48.037, Lifecycle Status=Active, Minimum Order=1, Number of Terminations=2, Package / Case="0402 (1005 Metric)", packaging=CutTape, Part Number=AC0402JR-071ML, Part Status=Active, partid=3387, price=0.01, Resistance="1 MOhms", series=AC, Size / Dimension="0.039\" L x 0.020\" W (1.00mm x 0.50mm)", Supplier 1=DigiKey
R24: library part CPF0402B100KE, "RES SMD 100K OHM 0.1% 1/16W 0402", Device Package="0402 (1005 Metric)", manufacturer="TE Connectivity Passive Product", Operating Temperature="-55°C ~ 155°C", Power (Watts)="0.063W, 1/16W", Supplier Device Package=0402, Supplier Part Number 1=A119916CT-ND, Temperature Coefficient=±25ppm/°C, Tolerance=±0.1%, componentlink1description=Datasheet, componentlink1url=https://www.te.com/commerce/DocumentDelivery/DDEController?Action=srchrtrv&DocNm=1773200&DocType=DS&DocLang=English, componentlink2description="DigiKey Link", componentlink2url=https://www.digikey.com/en/products/detail/te-connectivity-passive-product/CPF0402B100KE/4966480, Composition="Thin Film", Height - Seated (Max)="0.014\" (0.35mm)", lastupdated="09-02-2024 20:30:24", Lifecycle Status=Active, Minimum Order=1, Number of Terminations=2, Package / Case="0402 (1005 Metric)", packaging=TapeAndReel, Part Number=CPF0402B100KE, Part Status=Active, partid=2472, price=0.10, Resistance="100 kOhms", series="CPF, Neohm", Size / Dimension="0.039\" L x 0.020\" W (1.00mm x 0.50mm)", Supplier 1=DigiKey
R26: library part CRCW0603332KFKEAHP, "RES SMD 332K OHM 1% 1/3W 0603", Device Package="0603 (1608 Metric)", manufacturer="Vishay Dale", Operating Temperature="-55°C ~ 155°C", Power (Watts)="0.333W, 1/3W", Ratings=AEC-Q200, Supplier Device Package=0603, Supplier Part Number 1=541-332KSCT-ND, Temperature Coefficient=±100ppm/°C, Tolerance=±1%, componentlink1description=Datasheet, componentlink1url=http://www.vishay.com/docs/20043/crcwhpe3.pdf, componentlink2description="DigiKey Link", componentlink2url=https://www.digikey.com/en/products/detail/vishay-dale/CRCW0603332KFKEAHP/2226453, Composition="Thick Film", Features="Automotive AEC-Q200, Pulse Withstanding", Height - Seated (Max)="0.022\" (0.55mm)", lastupdated="09-02-2024 20:43:29", Lifecycle Status=Active, Minimum Order=1, Number of Terminations=2, Package / Case="0603 (1608 Metric)", packaging=TapeAndReel, Part Number=CRCW0603332KFKEAHP, Part Status=Active, partid=6710, price=0.02, Resistance="332 kOhms", series=CRCW-HP, Size / Dimension="0.063\" L x 0.033\" W (1.60mm x 0.85mm)", Supplier 1=DigiKey
TP3 TP4 TP5 TP6: "test point"
U1: "The Chip Type:Charging IC Voltage - Supply:3V~18V Voltage - Supply:3V~18V Charge Current - Max:1A Charging Saturation Voltage:4.4V End-Off Voltage:2.2V Type of Battery:Lithium Battery；LiFePO4 Battery Number of Cells:1 Number of Cells:1 Operating Temperatu", Battery Temperature Detection=Support, Charge Current - Max=1A, Charging Saturation Voltage=4.4V, End-Off Voltage=2.2V, JLCPCB Part Class="Extended Part", LCSC Part Name=单节1A独立线性电池充电器，具备电源路径、工厂模式和电池跟踪功能, manufacturer=TI(德州仪器), Operating Temperature=-40℃~+125℃, Supply Current (Iq)=4uA, Voltage - Supply=3V~18V, Datasheet=https://www.ti.com.cn/cn/lit/ds/symlink/bq25185.pdf?ts=1739415017761&ref_url=https%253A%252F%252Fwww.ti.com.cn%252Fproduct%252Fcn%252FBQ25185%253FkeyMatch%253Dbq25185%2526tisearch%253Duniversal_search, Manufacturer Part=BQ25185DLHR, Number of Cells=1, Supplier=LCSC, Supplier Footprint=WSON-10-EP(2.2x2), Supplier Part=C19725033, The Chip Type="Charging IC", Type of Battery="Lithium Battery；LiFePO4 Battery"
U2: library part CMP-06324-000078-1, "IC REG LINEAR 3.3V 500MA 6TDFN", Dropout Voltage=260mV, Max Operating Temperature=125°C, Min Current Limit=525mA, Min Operating Temperature=-40°C, Output Current=500mA, Output Voltage=3.3V, Mount="Surface Mount", Number of Regulators=1, packaging="Tape and Reel"
U3: library part CMP-12177-000003-1, "INEMO INERTIAL MODULE: 3D ACCELE", manufacturer=STMicroelectronics, Max Supply Voltage=3.6V, Min Supply Voltage=1.62V, Operating Supply Current=360-1200uA, Package=LGA-14L-DM00249496, Temperature="-40°C to +85°C", Temperature Range High=+85°C, Temperature Range Low=-40°C, Accel Range=2/4/8/16g, Automotive=No, Category=IC, componentlink2description=Datasheet, componentlink2url=https://www.st.com/resource/en/datasheet/lsm6dsr.pdf, Device Class L1=Sensors, Device Class L2="Motion Sensors", Device Class L3="Inertial Measurement Units (IMUs)", Digikey Description="INEMO INERTIAL MODULE: 3D ACCELE", Footprint Url=https://www.st.com/content/ccc/resource/technical/document/technical_note/73/17/9c/16/dd/96/4a/01/CD00134799.pdf/files/CD00134799.pdf/jcr:content/translations/en.CD00134799.pdf, Gyro Range=125/250/500/1000/2000/4000°/s, Height=0.86mm, Lead Free=Yes, Manufacturer Part Number=LSM6DSRTR, Mouser Description="In a Pack of 2, LSM6DSRTR STMicroelectronics, 3-Axis Accelerometer, Gyroscope, 14-Pin LGA", Octopart=https://octopart.com/lsm6dsrtr-stmicroelectronics-93180177, RoHS=TRUE, Sensor Output=I2C,SPI, Sensor Type=Temperature,Accelerometer,Gyroscope
U4: library part HJ-840_C50052094, "Utilized IC / Part:nRF52840 Interface Type:UART Wireless Standard:BLE5.4 Output Power(Max):8dBm Output Power(Max):8dBm Voltage - Supply:1.7V~5.5V Voltage - Supply:1.7V~5.5V Antenna Type:On-board PCB Antenna or External Antenna Receive  Current:4.6mA Send", JLCPCB Part Class="Extended Part", LCSC Part Name="HJ-840基于Nordic nRF52840的高性能、超薄型，小尺寸 6.2 × 7.0 × 0.9 mm含天线 BLE 5.4 芯片级SIP蓝牙模组", manufacturer=HJSIP(宏佳电子), Operating Temperature=-40℃~+85℃, Output Power(Max)=8dBm, Receive  Current=4.6mA, Send  Current=4.8mA, Voltage - Supply=1.7V~5.5V, Antenna Type="On-board PCB Antenna or External Antenna", Communication Distance=80m, Datasheet=https://item.szlcsc.com/datasheet/HJ-840/52617268.html, Features="Encryption function", Interface Type=UART, Manufacturer Part=HJ-840, Sensitivity=-95dBm, Supplier=LCSC, Supplier Footprint=LGA-64(6.2x7), Supplier Part=C50052094, Utilized IC / Part=nRF52840, Wireless Standard=BLE5.4
U5: library part CMP-09085-000022-1, "IC ECG FRONT END 20LFCSP", Case/Package="LFCSP EP", Input Bias Current=200pA, Input Offset Voltage (Vos)=3mV, Max Operating Temperature=85°C, Max Supply Voltage=3.5V, Min Operating Temperature=-40°C, Min Supply Voltage=2V, Operating Supply Current=170uA, Power Supply Rejection Ratio (PSRR)=90dB, Common Mode Rejection Ratio=80dB, Contact Plating=Tin, Gain Bandwidth Product=100kHz, Height=0.75mm, Lead Free="Contains Lead", Length=4.1mm, Mount="Surface Mount", Number of Channels=1, Number of Pins=20, packaging=Tray, Radiation Hardening=No, REACH SVHC="No SVHC", RoHS Compliant=Yes, series=-, Slew Rate=0.2V/µs, Width=4.1mm
U7: "USB 2.0-only 14P Type-C Receptacle connector", Datasheet=https://www.usb.org/sites/default/files/documents/usb_type-c.zip, Description_="USB 2.0-only 14P Type-C Receptacle connector", ki_fp_filters=USB*C*Receptacle*, ki_keywords="usb universal serial bus type-C USB2.0", Reference=J

## Free pads (board coordinates)
  round 1.8 hole 1.09: 2(48.184,52.73) 2(48.184,55.27)

## Via types
v1: diameter 0.4, hole 0.3, Top Layer to Bottom Layer, 40 vias

## Nets (pads, with @x,y where several pads share a name; then routed paths per layer and width w, separated by ;. In a path a pad name is that pad's centre, name@x,y a point inside that pad or via, vN(x,y) a via of type N, cw(c..) or ccw(c..) an arc to the next point about the centre after c; other vN are vias at no path point)
3V3: C2.2 C3.2 C6.2 C10.1 C13.2 R1.1 R3.1 R8.1 R10.2 R11.2 R16.1 R17.1 TP5.1 U2.1 U2.2 U3.5 U3.8 U4.H2 U4.H3 U4.H4 U5.15 U5.17 | length 71.4
  Top Layer w0.2: 50.265,56.066 50.432,56.066 51.197,56.066 51.227,56.036
  Top Layer w0.4: v1(47.752,56.642) 47.871,56.523 49.047,56.523 49.057,56.532 49.58,56.532 ; v1(48.445,57.125) 48.446,57.123 49.177,57.123 R16.1 ; R8.1 48.853,59.858 R8.1@48.89,59.894 ; v1(49.073,63.5) 49.363,63.79 49.994,63.79 50.094,63.89 C10.1 ; C13.2 49.18,61.333 49.08,61.233 49.08,60.713 v1(48.895,60.528) 48.89,60.523 R8.1@48.89,59.894 ; C13.2@49.22,61.333 49.603,60.95 49.603,60.845 49.75,60.697 49.97,60.697 ; R16.1@49.293,57.05 49.293,56.819 49.58,56.532 ; v1(49.515,60.442) 49.206,60.442 48.89,60.126 R8.1@48.89,59.894 ; 50.265,56.066 50.047,56.066 49.58,56.532 ; U5.17 49.97,60.697 ; 51.415,55.803 51.535,55.803 51.664,55.674 R17.1 ; R17.1@51.664,55.587 51.978,55.273 51.978,54.956 v1(52.324,54.61) ; U5.15 51.734,62.15 51.654,62.07 50.854,62.07 50.423,61.64 50.246,61.64 49.978,61.371 49.978,60.705 49.97,60.697 ; v1(63.398,66.954) 64.364,66.954 64.795,66.523 64.795,65.583 v1(64.821,65.557) ; v1(64.795,61.062) v1@64.795,65.557
  Bottom Layer w0.24: U2.2 U2.1 55.507,57.639 55.637,57.509 55.637,57.478 55.985,57.13 57.995,57.13 58.293,57.427 58.293,57.928 ; TP5.1 58.293,57.928 ; C6.2@58.627,56.594 58.921,56.888 58.921,57.3 58.293,57.928 ; C6.2@58.863,56.54 C6.2@58.921,56.598
  Bottom Layer w0.4: v1(48.895,60.528) 48.895,63.322 v1(49.073,63.5) 49.457,63.5 49.939,63.018 U4.H3 ; v1(52.324,54.61) 52.745,54.189 52.745,54.16 53.678,53.227 54.29,53.227 55.404,52.113 58.676,52.113 59.148,52.585 59.148,53.857 ; R1.1 57.685,53.243 58.227,53.243 58.244,53.226 58.517,53.226 59.148,53.857 ; TP5.1 59.901,57.32 59.901,55.202 ; R11.2 59.842,61.986 60.554,61.274 61.672,61.274 61.865,61.467 61.865,61.492 62.247,61.874 R3.1 ; v1(62.027,55.093) 61.989,55.131 61.989,55.817 ; R3.1@62.397,61.874 62.923,62.4 U3.8@62.923,62.922 ; R10.2 62.651,66.573 63.032,66.954 v1(63.398,66.954) ; U3.8 62.89,62.955 U3.8@62.923,62.922 ; U3.5 63.74,64.68 63.779,64.719 ; C2.2 C2.2@63.779,62.922 ; C3.2@64.013,65.6 63.779,65.366 C2.2@63.779,62.922 ; C3.2 64.778,65.6 v1(64.821,65.557) ; v1(64.795,61.062) 64.488,61.062 62.407,58.981 62.407,56.235 61.989,55.817 ; 59.148,53.857 59.779,54.488 59.779,55.08 59.901,55.202 ; 59.901,55.202 60.431,54.673 60.845,54.673 61.989,55.817 ; U3.8@62.923,62.922 C2.2@63.779,62.922
A0: C17.1 R27.1 U4.E7 U5.10 | length 18.8
  Top Layer w0.2: v1(52.984,66.751) 52.984,64.721 54.481,63.225 54.481,61.216 54.499,61.197 U5.10 55.07,61.197 55.802,61.929 R27.1 56.914,61.854 57.546,61.222 57.727,61.222 58.246,60.703 58.246,59.649 57.912,59.315 57.912,56.506 57.386,55.98 57.22,55.98 57.2,56 56.073,56 C17.1
  Bottom Layer w0.2: U4.E7 52.679,65.618 52.921,65.859 52.954,65.859 53.109,66.015 53.109,66.572 52.984,66.697 v1(52.984,66.751)
BAT: C1.1 pad.2@48.184,55.27 U1.2 | length 5.3
  Bottom Layer w0.2: pad.2@48.292,55.27 49.422,54.141 49.422,53.973 C1.1
  Bottom Layer w0.4: pad.2@48.184,55.27 49.875,55.27 50.111,55.507 51.403,55.507 51.412,55.498 51.486,55.498
CC1: R12.2 U7.A5 | length 4
  Top Layer w0.254: R12.2 56.421,52.273 57.145,52.996 57.145,53.046 58.271,54.173 U7.A5
CC2: R13.2 U7.B5 | length 5.6
  Top Layer w0.2: R13.2 59.144,61.37 58.815,61.37 58.581,61.136 58.581,57.523 58.931,57.173 U7.B5
D_N: D2.1 U4.G1 U7.A7 U7.B7 | length 18.8
  Top Layer w0.104: D2.1 57.732,54.913 58.06,55.241 58.06,55.279 58.454,55.673 U7.A7@58.931,55.673 ; U7.B7 58.931,54.673 58.629,54.975 58.629,55.371 U7.A7@58.931,55.673 ; v1(60.465,55.771) 60.416,55.722 59.555,55.722 U7.A7 U7.A7@58.931,55.673
  Bottom Layer w0.104: U4.G1 51.007,61.57 51.121,61.57 51.182,61.509 51.182,61.294 52.129,60.347 56.542,60.347 56.941,59.948 57.962,59.948 cw(c57.962,59.844) 58.035,59.918 58.305,59.649 ccw(c58.557,59.903) 58.455,59.56 cw(c58.293,58.928) 58.925,59.09 ccw(c59.268,59.192) 59.014,58.94 60.041,57.913 cw(c59.966,57.84) 60.071,57.84 60.071,57.797 ccw(c60.429,57.797) 60.175,57.544 60.223,57.495 cw(c60.149,57.422) 60.253,57.422 60.253,57.33 cw(c59.901,57.32) 60.253,57.32 60.253,57.14 ccw(c60.612,57.15) 60.357,56.898 60.432,56.823 60.941,56.314 60.941,56.08 60.735,55.875 60.649,55.875 60.546,55.771 v1(60.465,55.771)
D_P: D1.1 U4.F1 U7.A6 U7.B6 | length 20.7
  Top Layer w0.104: D1.1 57.133,55.431 57.686,55.431 57.694,55.423 57.824,55.423 58.328,55.927 58.685,55.927 58.917,56.159 U7.B6@59.538,56.159 ; U7.A6 60.935,55.173 61.051,55.288 ; U7.B6@59.538,56.173 60.88,56.173 61.051,56.002 61.051,55.288 ; v1(60.867,55.473) 61.051,55.288
  Bottom Layer w0.104: U4.F1 51.611,61.57 51.497,61.57 51.436,61.509 51.436,61.4 52.235,60.601 56.647,60.601 57.047,60.202 57.962,60.202 cw(c57.962,59.844) 58.215,60.098 58.484,59.829 ccw(c58.557,59.903) 58.529,59.803 cw(c58.293,58.928) 59.168,59.164 ccw(c59.268,59.192) 59.194,59.119 60.221,58.092 cw(c59.966,57.84) 60.325,57.84 60.325,57.797 ccw(c60.429,57.797) 60.355,57.723 60.404,57.675 cw(c60.149,57.422) 60.508,57.422 60.508,57.15 ccw(c60.612,57.15) 60.538,57.077 60.612,57.003 61.196,56.419 61.196,55.975 60.923,55.703 60.923,55.529 v1(60.867,55.473)
ECG_LOD_N: U4.E8 U5.11 | length 6
  Top Layer w0.2: v1(52.299,66.827) 52.299,64.897 53.721,63.474 53.721,62.201 U5.11
  Bottom Layer w0.2: v1(52.299,66.827) 52.337,66.789 52.337,66.57 52.639,66.268 U4.E8
ECG_LOD_P: U4.F8 U5.12 | length 6
  Top Layer w0.2: v1(51.6,66.866) 51.6,64.986 53.234,63.352 U5.12
  Bottom Layer w0.2: v1(51.6,66.866) 51.6,66.812 51.644,66.768 51.644,66.368 51.744,66.268 U4.F8
ECG_SDN: R14.2 U4.G8 U5.13 | length 8.4
  Top Layer w0.254: v1(49.439,66.419) 49.793,66.773 50.004,66.773 51.26,65.517 51.26,64.418 51.716,63.962 R14.2 51.902,63.731 52.185,63.448 52.452,63.448 52.734,63.166 U5.13
  Bottom Layer w0.254: v1(49.439,66.419) 49.439,66.458 49.512,66.531 49.512,66.562 49.645,66.695 50.412,66.695 50.839,66.268 U4.G8
GND: C1.2 C2.1 C3.1 C4.2 C5.1 C6.1 C7.1 C10.2 C13.1 C15.1 D1.2 D2.2 pad.2@48.184,52.73 R4.1 R5.1 R6.1 R12.1 R13.1 R14.1 R25.1 TP6.1 U1.4 U1.5 U1.11 U2.3 U2.7 U3.1 U3.2 U3.3 U3.6 U3.7 U4.A1 U4.H8 U5.14 U5.16 U5.21 U7.A1 U7.A12 U7.B1 U7.B12 U7.SH | length 89.2